# Altium PCB PCB Project Dual BLDC Motor.PcbDoc
Units mm, origin at the board's own origin, x right, y up, seen from the top; angles counter-clockwise.
Board outline 35 x 35 mm, 4 copper layers (Top Layer 1, GND, PWR, Bottom Layer 1), stack 0.603 mm thick; 55 components, 57 nets, 268 pads, 88 vias.
Unrouted connection lines stored in the file: 140.
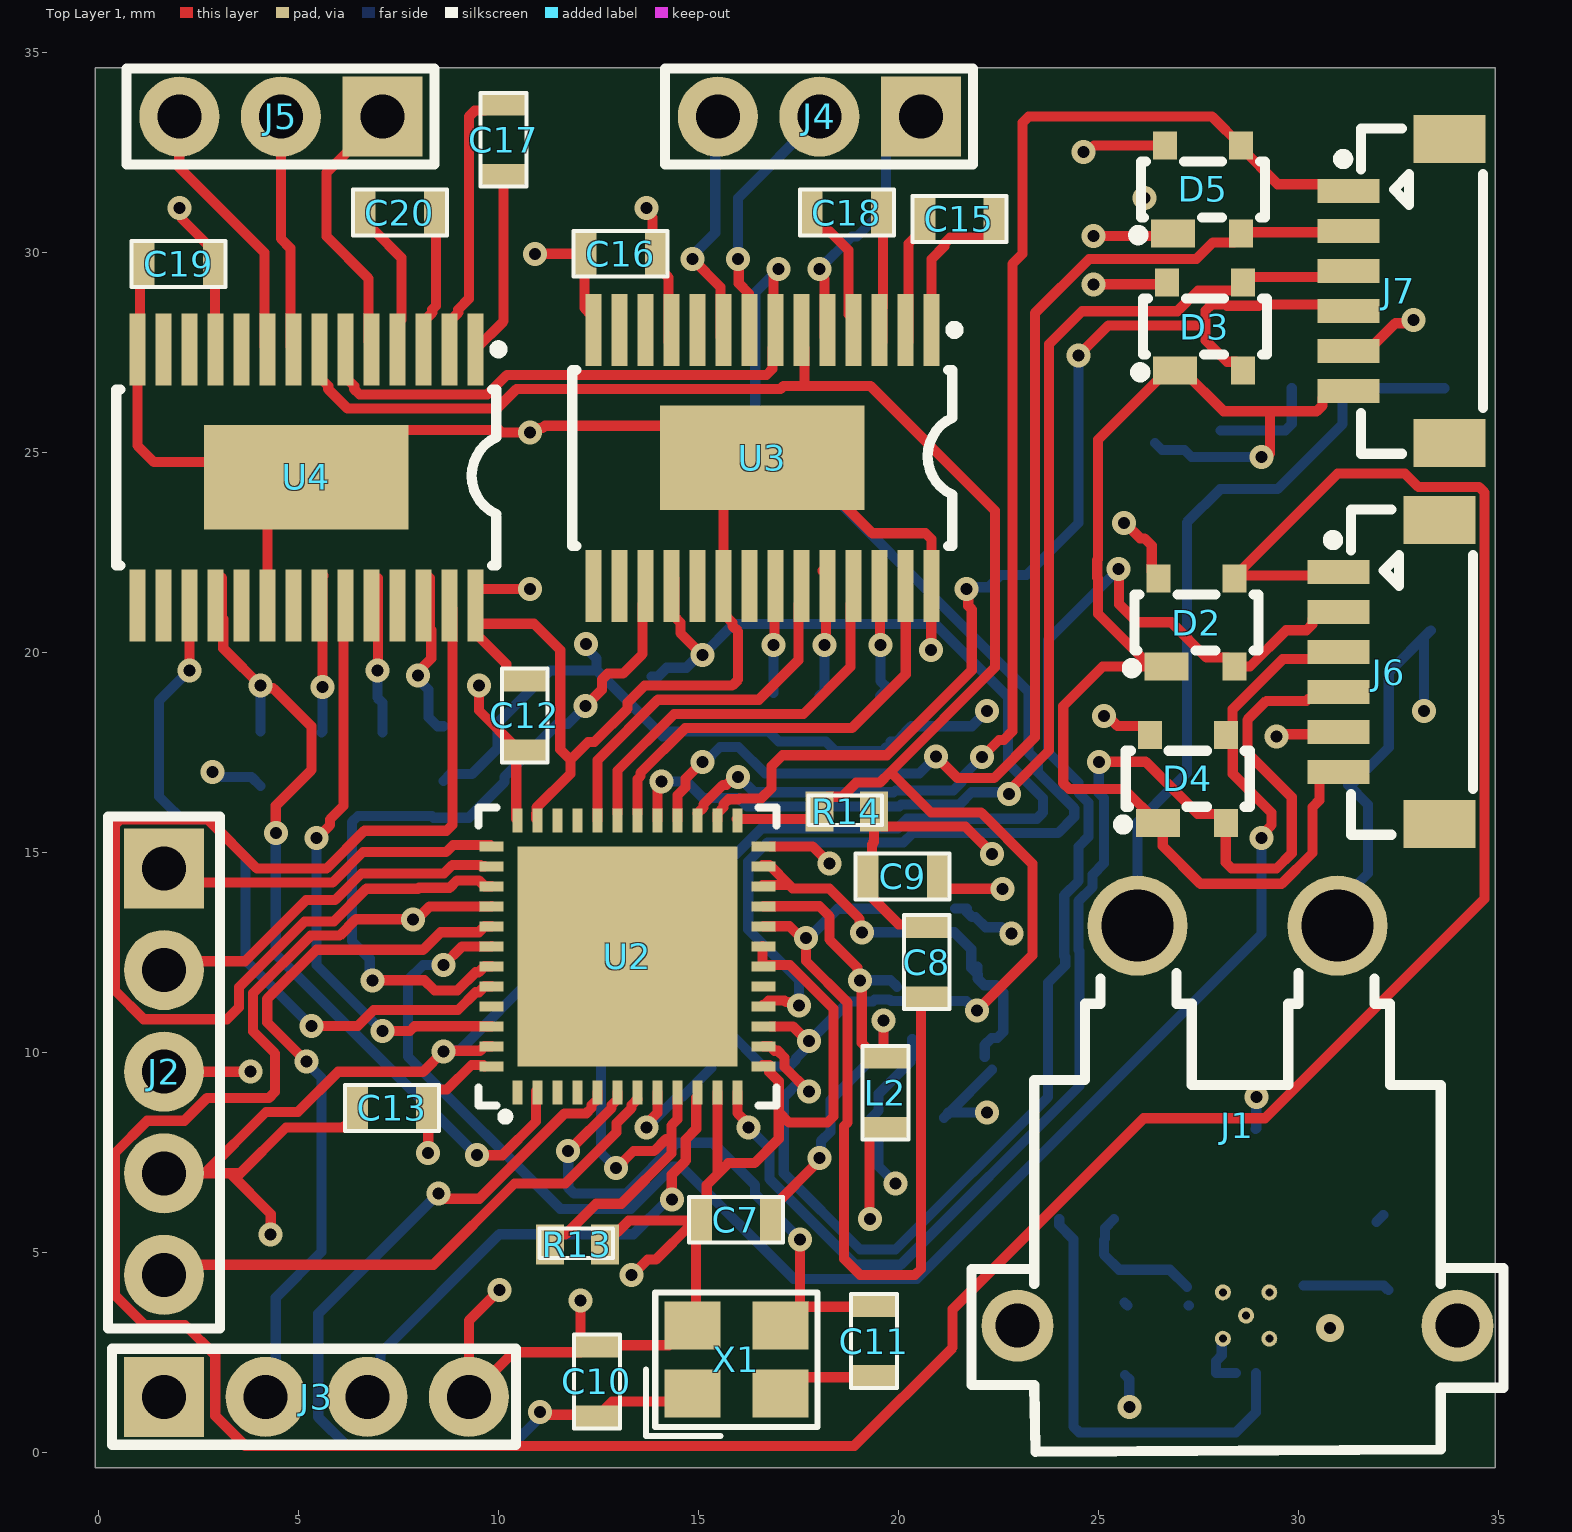
[diagram p0: Top Layer 1 view]
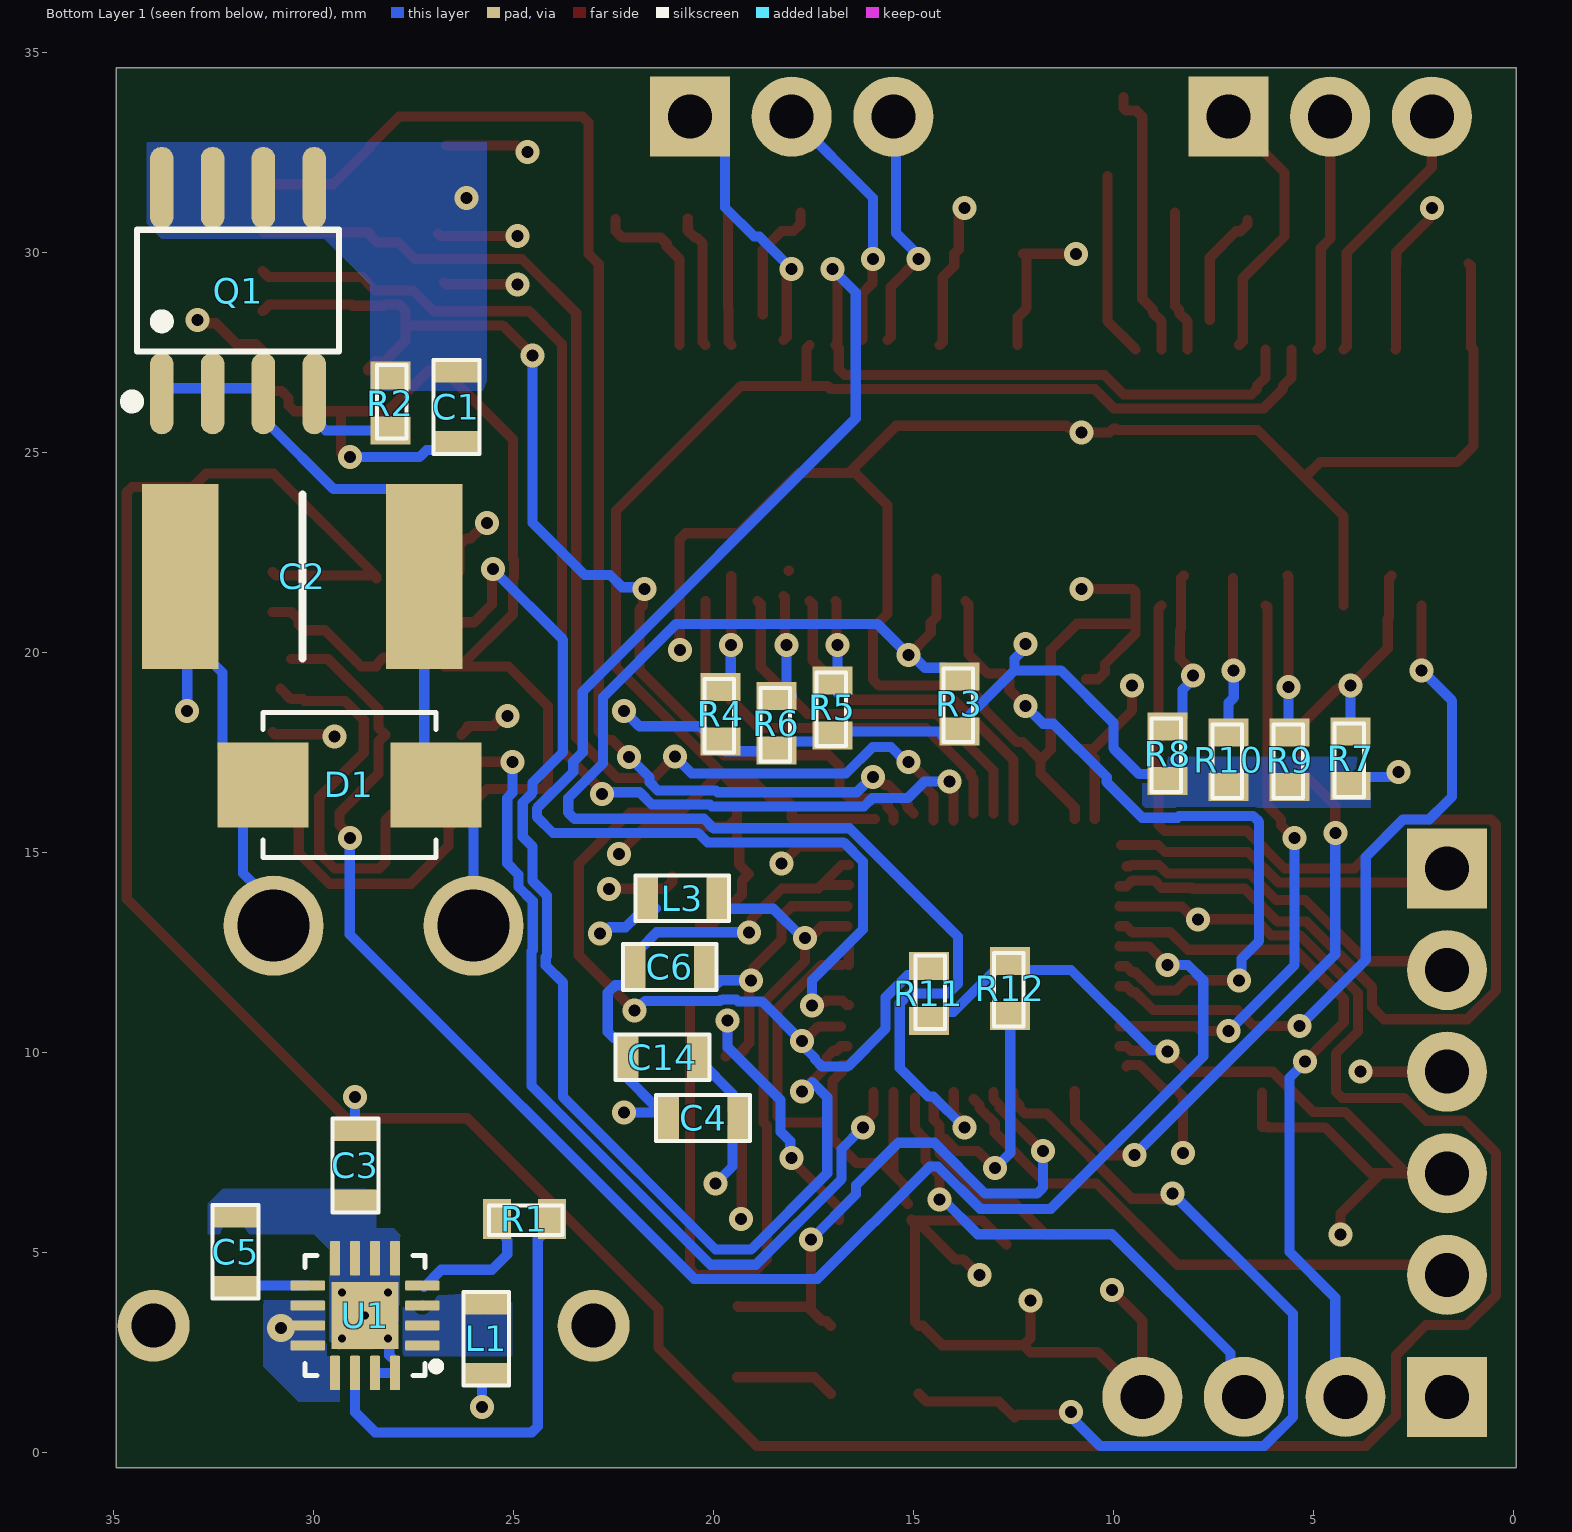
[diagram p1: Bottom Layer 1 view, seen from below]
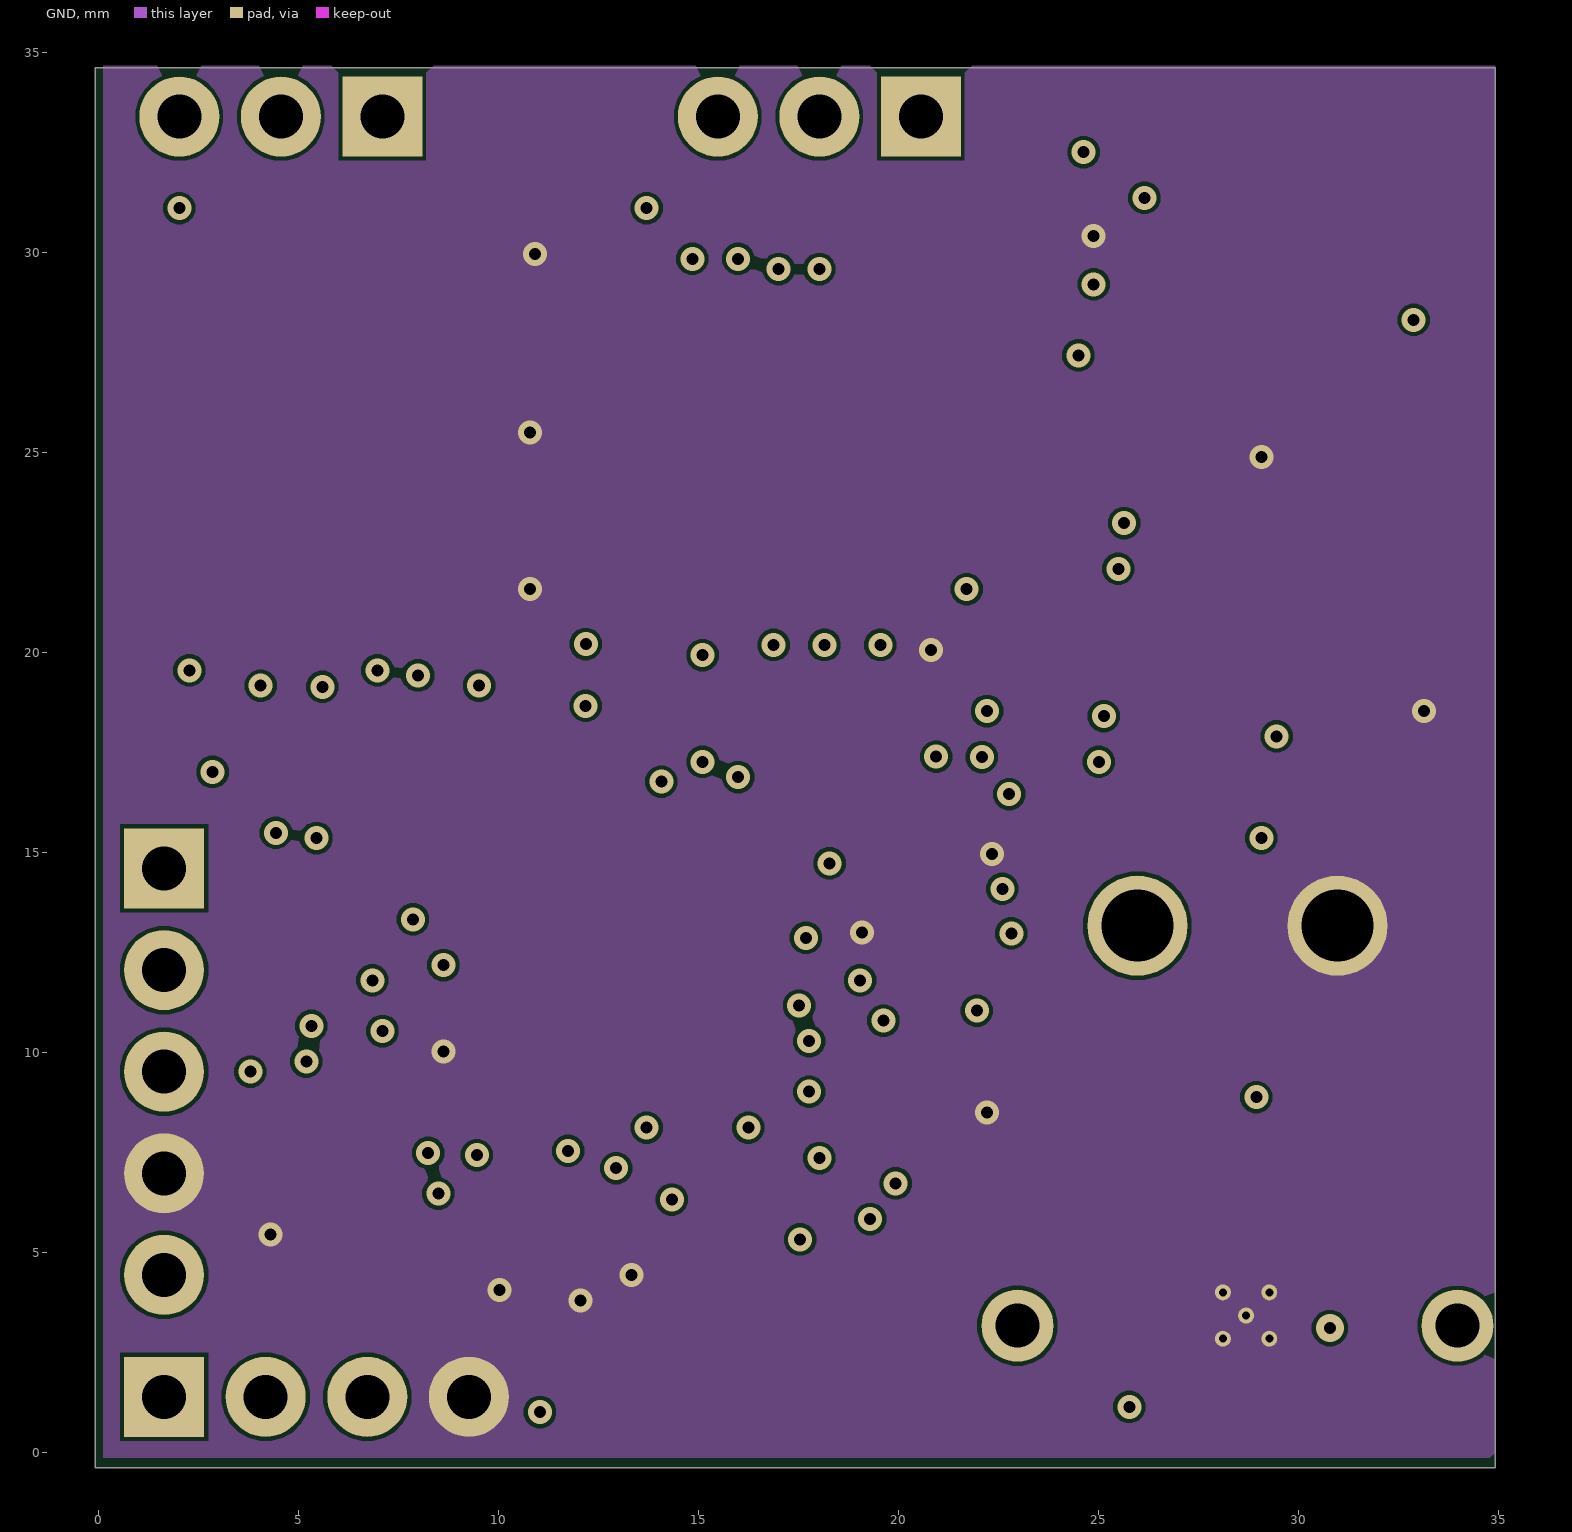
[diagram p2: GND]
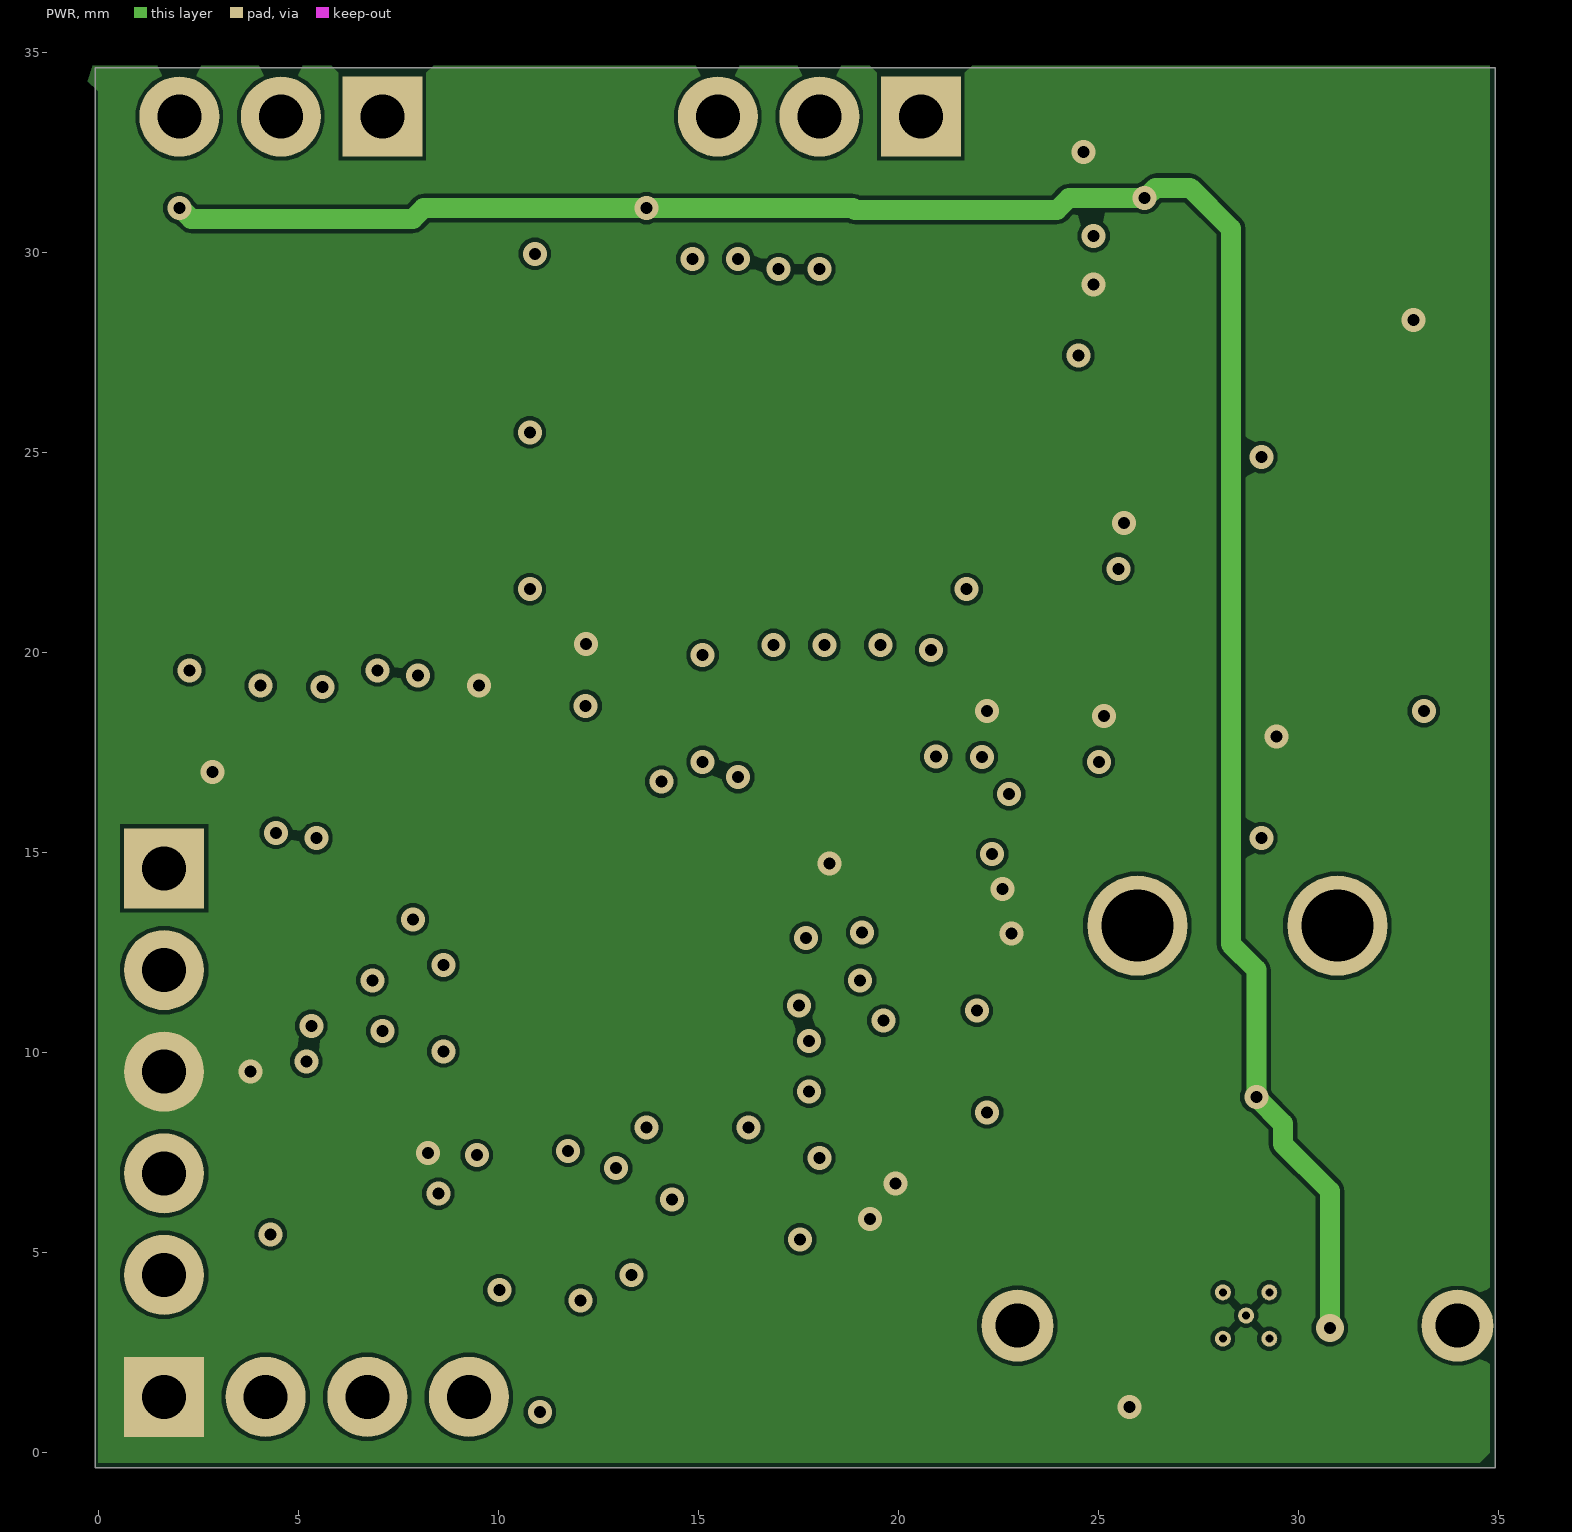
[diagram p3: PWR]

## Layer stack, top to bottom
Top Solder: solder mask 0.0102, Solder Resist, Dk 3.5
Top Layer 1: signal copper 0.035
Dielectric 2: prepreg 0.0711, PP-006, Dk 4.1
GND: signal copper 0.0356
Dielectric 1: dielectric 0.32, FR-4, Dk 4.8
PWR: signal copper 0.0356
Dielectric 3: prepreg 0.0711, PP-006, Dk 4.1
Bottom Layer 1: signal copper 0.035
Bottom Solder: solder mask 0.0102, Solder Resist, Dk 3.5

## Board outline
-0.075,-0.381 -0.075,34.619 34.925,34.619 34.925,-0.381

## Design rules (kind name [scope] priority, off if disabled: settings)
Clearance [All] p1: gap=0.1 ignorepadtopadclearanceinfootprint=FALSE
HoleSize [All] p1: absolutevalues=TRUE maxlimit=3 minlimit=0.025 maxpercent=80.000 minpercent=20.000
HoleToHoleClearance [All] p1: gap=0.01 allowstackedmicrovias=TRUE
MinimumSolderMaskSliver [All] p1: minsoldermaskwidth=0.01
PolygonConnect [All] p1: connectstyle=Direct reliefconductorwidth=0.254 reliefentries=4 polygonreliefangle="90 Angle" airgapwidth=0.254
RoutingVias [All] p1: holewidth=2.5 width=1.5 viastyle="Through Hole" minholewidth=0.3 minwidth=0.6 maxholewidth=3 maxwidth=3
SilkToSilkClearance [All] p1: silktosilkclearance=0.01
SilkToSolderMaskClearance [IsPad] p1: minsilkscreentomaskgap=0 clearancetoexposedcopper=TRUE
SolderMaskExpansion [All] p1: expansion=0.102 istentingtop=FALSE
SupplyNets "Schematic Supply Nets_4" [InNet('GND')] p1: voltage=0.000
SupplyNets "Schematic Supply Nets_2" [InNet('+12V')] p2: voltage=0.000
SupplyNets "Schematic Supply Nets_5" [InNet('+3V3')] p3: voltage=0.000
Width [All] p1: maxlimit=0.5 minlimit=0.254 preferedwidth=0.254 toplayer_maxwidth=0.254 midlayer1_maxwidth=0.254 bottomlayer_maxwidth=0.254 minimp=50.000000 maximp=50.000000 favimp=50.000000
25 further rules are at their usual default settings.

## Classes and differential pairs
component class Sheet4: D2 D3 D4 D5 J6 J7
component class Sheet3: C15 C16 C17 C18 C19 C20 J4 J5 R3 R4 R5 R6 R7 R8 R9 R10 R11 R12 R13 R14 U3 U4
component class Sheet2: C6 C7 C8 C9 C10 C11 C12 C13 C14 J2 J3 J? L2 L3 U2 X1
component class Sheet1: C1 C2 C3 C4 C5 D1 J1 L1 Q1 R1 R2 U1

## Components (designator, comment, footprint, x,y, rotation, side; value= is the part's Value field where it differs from the comment)
C1 "capacitor symbol" CAPACITOR#1 26.308,25.311 r90 bottom value=100nF
C2 "d" "CAPACITOR T59EE477M016C0025" 30.734,21.463 r180 bottom
C3 "capacitor symbol" CAPACITOR#1 28.829,6.35 r90 bottom value=10uF
C4 "capacitor symbol" CAPACITOR#1 21.082,8.255 r180 bottom value=22uF
C5 "capacitor symbol" CAPACITOR#1 32.045,5.855 r270 bottom value=3.3nF
C6 "capacitor symbol" CAPACITOR#1 21.916,12.034 r180 bottom value=1uF
C7 "capacitor symbol" CAPACITOR#2 15.113,5.715 r0 top value=1uF
C8 "capacitor symbol" CAPACITOR#2 20.828,11.43 r90 top value=1uF
C9 "capacitor symbol" CAPACITOR#2 19.281,14.295 r0 top value=1uF
C10 "6.8pF" CAPACITOR#2 12.582,0.945 r90 top value=1uF
C11 "6.8pF" CAPACITOR#2 19.295,3.627 r270 top value=1uF
C12 "capacitor symbol" CAPACITOR#2 10.56,19.266 r270 top value=1uF
C13 "capacitor symbol" CAPACITOR#2 6.515,8.505 r0 top value=1uF
C14 "capacitor symbol" CAPACITOR#1 22.098,9.779 r180 bottom value=1uF
C15 "capacitor symbol" CAPACITOR#2 20.701,30.734 r0 top value=0.01uF
C16 "capacitor symbol" CAPACITOR#2 12.23,29.864 r0 top value=10uF
C17 "capacitor symbol" CAPACITOR#2 10.033,33.655 r270 top value=0.01uF
C18 "capacitor symbol" CAPACITOR#2 19.558,31.115 r180 top value=100nF
C19 "capacitor symbol" CAPACITOR#2 1.181,29.61 r0 top value=10uF
C20 "capacitor symbol" CAPACITOR#2 8.382,31.115 r180 top value=100nF
D1 "SMBJ15CA" DIOM4336X265N 29.21,16.637 r180 bottom
D2 "PRTR5V0U2X-N" PRTR5V0U2X-N 28.404,21.864 r270 top
D3 "PRTR5V0U2X-N" PRTR5V0U2X-N 28.612,29.261 r270 top
D4 "PRTR5V0U2X-N" PRTR5V0U2X-N 28.182,17.958 r270 top
D5 "PRTR5V0U2X-N" PRTR5V0U2X-N 28.563,32.69 r270 top
J1 "J" XT30PW-M 28.256,5.595 r0 top
J2 "5 pin header" "5 PIN HEADER" 1.651,14.705 r0 top
J3 "hg" "4 PIN HEADEER STM32" 1.651,1.397 r90 top
J4 "B3B-EH-A(LF)(SN" "3 PIN HEADER" 20.674,33.301 r270 top
J5 "B3B-EH-A(LF)(SN" "3 PIN HEADER" 7.212,33.301 r270 top
J6 "BM06B-SRSS-TB(LF)(SN)" BM06B-SRSS-TB(LF)(SN) 32.893,19.558 r90 top
J7 "BM06B-SRSS-TB(LF)(SN)" BM06B-SRSS-TB(LF)(SN) 33.147,29.083 r90 top
L1 "2.2uH" CAPACITOR#1 25.781,3.683 r270 bottom
L2 "inductor" CAPACITOR#2 19.793,8.166 r90 top
L3 "inductor" CAPACITOR#1 19.939,13.97 r0 bottom
Q1 "AO4407A" AO4407A 33.778,31.774 r180 bottom
R1 "Resistor 1206" RESISTOR#1 24,5.842 r0 bottom
R2 "Resistor 1206" RESISTOR#1 28.067,26.956 r270 bottom
R3 "Resistor 1206" RESISTOR#1 13.843,18.002 r90 bottom
R4 "Resistor 1206" RESISTOR#1 19.812,17.748 r90 bottom
R5 "Resistor 1206" RESISTOR#1 17.018,17.904 r90 bottom
R6 "Resistor 1206" RESISTOR#1 18.415,17.523 r90 bottom
R7 "Resistor 1206" RESISTOR#1 4.064,16.634 r90 bottom
R8 "Resistor 1206" RESISTOR#1 8.636,16.761 r90 bottom
R9 "Resistor 1206" RESISTOR#1 5.588,16.605 r90 bottom
R10 "Resistor 1206" RESISTOR#1 7.112,16.605 r90 bottom
R11 "Resistor 1206" RESISTOR#1 14.605,12.195 r270 bottom
R12 "Resistor 1206" RESISTOR#1 12.573,10.89 r90 bottom
R13 "Resistor 1206" RESISTOR#2 11.271,5.207 r0 top
R14 "Resistor 1206" RESISTOR#2 18.002,16.025 r0 top
U1 "D" IC-TPS62132RGTR 28.772,3.49 r0 bottom
U2 "U" STM32G474CBT3 11.223,12.718 r0 top
U3 "U" DRV8313PWP 16.637,24.765 r270 top
U4 "U" DRV8313PWP 5.237,24.278 r270 top
X1 "24MHz" XL2EL89COI-111YLC-24M 14.928,3.167 r0 top

## Footprints (in the part's own frame and the unit in brackets; to place one, negate y for a bottom-side part, rotate by r counter-clockwise, add the part's x,y. Pads: shape width x height; smd on the part's side, far side on the other; paste and mask are expansions set on the pad)
"3 PIN HEADER" [mm]
  rect 2x2 hole 1.1: 1(-0.1,-0.1)
  round 2 hole 1.1: 2(-0.1,-2.64) 3(-0.1,-5.18)
  silkscreen extent -1.3,-6.5 1.1,1.2
"4 PIN HEADEER STM32" [mm]
  rect 2x2 hole 1.1: 1(0,0)
  round 2 hole 1.1: 2(0,-2.54) 3(0,-5.08) 4(0,-7.62)
  silkscreen extent -1.2,-8.8 1.2,1.3
"5 PIN HEADER" [mm]
  rect 2x2 hole 1.1: 1(0,-0.1)
  round 2 hole 1.1: 2(0,-2.64) 3(0,-5.18) 4(0,-7.72) 5(0,-10.26)
  silkscreen extent -1.4,-11.6 1.4,1.2
AO4407A [mm]
  oval 0.588x2.045 smd: 1(-0.004,-5.29) 2(1.266,-5.29) 3(2.536,-5.29) 4(3.806,-5.29) 5(3.806,-0.151) 6(2.536,-0.151) 7(1.266,-0.151) 8(-0.004,-0.151)
  silkscreen extent -0.9,-5.64 4.43,-1.2
BM06B-SRSS-TB(LF)(SN) [mm]
  rect 0.6x1.55 smd: 1(2.455,1.885) 2(1.455,1.885) 3(0.455,1.885) 4(-0.545,1.885) 5(-1.545,1.885) 6(-2.544,1.885)
  rect 1.2x1.8 smd: 7(-3.845,-0.64) 8(3.756,-0.64)
  silkscreen extent -4.11,-1.48 4.02,2.15
CAPACITOR#1 [mm]
  rect 0.6x1.2 smd paste-2539.97 mask+0.102: 1(-0.069,0.117) 2(1.74,0.108)
  silkscreen extent -0.34,-0.46 2.01,0.68
CAPACITOR#2 [mm]
  rect 0.6x1.2 smd paste-2539.97 mask-2539.97: 1(-0.069,0.117) 2(1.74,0.108)
  silkscreen extent -0.34,-0.46 2.01,0.68
"CAPACITOR T59EE477M016C0025" [mm]
  rect 1.92x4.62 smd: 1(-2.587,0.444) 2(3.513,0.444)
  silkscreen extent 0.46,-1.61 0.46,2.49
DIOM4336X265N [mm]
  rect 2.28x2.12 smd paste+0 mask+0.102: 1(-2.045,0.059) 2(2.285,0.059)
  silkscreen extent -2.04,-1.75 2.28,1.87
DRV8313PWP [mil]
  rect 71x16 smd paste+0 mask+2: 1(-130.16,165.32) 2(-130.16,139.73) 3(-130.16,114.14) 4(-130.16,88.55) 5(-130.16,62.96) 6(-130.16,37.37) 7(-130.16,11.78) 8(-130.16,-13.82) 9(-130.16,-39.41) 10(-130.16,-65) 11(-130.16,-90.59) 12(-130.16,-116.18) 13(-130.16,-141.77) 14(-130.16,-167.36) 15(121.81,-167.22) 16(121.81,-141.63) 17(121.81,-116.04) 18(121.81,-90.45) 19(121.81,-64.86) 20(121.81,-39.27) 21(121.81,-13.68) 22(121.81,11.78) 23(121.81,37.37) 24(121.81,62.96) 25(121.81,88.55) 26(121.81,114.14) 27(121.81,139.73) 28(121.81,165.32)
  rect 103.15x201.57 smd paste+0 mask+2: 29(-4.18,-1.19)
  silkscreen extent -134,-188 82,192
IC-TPS62132RGTR [mm]
  rrect25% 0.86x0.26 smd paste+0 mask+0.102: 1(-1.505,0.811) 2(-1.505,0.311) 3(-1.505,-0.189) 4(-1.505,-0.689) 9(1.365,-0.689) 10(1.365,-0.189) 11(1.365,0.311) 12(1.365,0.811)
  rrect25% 0.26x0.86 smd paste+0 mask+0.102: 5(-0.82,-1.374) 6(-0.32,-1.374) 7(0.18,-1.374) 8(0.68,-1.374) 13(0.68,1.496) 14(0.18,1.496) 15(-0.32,1.496) 16(-0.82,1.496)
  round 0.4 hole 0.2 mask+0: 17(-0.65,-0.519) 17(-0.65,0.641) 17(0.51,-0.519) 17(0.51,0.641)
  rect 1.68x1.68 smd paste-0.31 mask+0.102: 17(-0.07,0.061)
  round 0.4 hole 0.2 paste-0.31 mask+0.102: 17(-0.07,0.061)
  silkscreen extent -1.95,-1.44 1.43,1.56
PRTR5V0U2X-N [mm]
  rect 0.7x1.1 smd paste+0 mask+0.051: 1(2.21,-1.688)
  rect 0.7x0.6 smd paste+0 mask+0.051: 2(2.21,0.012) 3(0.01,0.012) 4(0.01,-1.888)
  silkscreen extent 0.41,-2.68 2.38,0.61
RESISTOR#1 [mm]
  rect 0.7x1 smd paste-2539.97 mask+0.102: 1(1.4,0) 2(0.032,0)
  silkscreen extent -0.24,-0.34 1.6,0.4
RESISTOR#2 [mm]
  rect 0.7x1 smd paste-2539.97 mask-2539.97: 1(1.4,0) 2(0.032,0)
  silkscreen extent -0.24,-0.34 1.6,0.4
STM32G474CBT3 [mm]
  rect 0.25x0.6 smd paste-100 mask+0.05: 1(-0.736,-3.708) 2(-0.236,-3.708) 3(0.264,-3.708) 4(0.764,-3.708) 5(1.264,-3.708) 6(1.764,-3.708) 7(2.264,-3.708) 8(2.764,-3.708) 9(3.264,-3.708) 10(3.764,-3.708) 11(4.264,-3.708) 12(4.764,-3.708) 25(4.764,3.092) 26(4.264,3.092) 27(3.764,3.092) 28(3.264,3.092) 29(2.764,3.092) 30(2.264,3.092) 31(1.764,3.092) 32(1.264,3.092) 33(0.764,3.092) 34(0.264,3.092) 35(-0.236,3.092) 36(-0.736,3.092)
  rect 0.6x0.25 smd paste-100 mask+0.05: 13(5.414,-3.058) 14(5.414,-2.558) 15(5.414,-2.058) 16(5.414,-1.558) 17(5.414,-1.058) 18(5.414,-0.558) 19(5.414,-0.058) 20(5.414,0.442) 21(5.414,0.942) 22(5.414,1.442) 23(5.414,1.942) 24(5.414,2.442) 37(-1.386,2.442) 38(-1.386,1.942) 39(-1.386,1.442) 40(-1.386,0.942) 41(-1.386,0.442) 42(-1.386,-0.058) 43(-1.386,-0.558) 44(-1.386,-1.058) 45(-1.386,-1.558) 46(-1.386,-2.058) 47(-1.386,-2.558) 48(-1.386,-3.058)
  rect 5.5x5.5 smd paste-100 mask+0.05: 49(2.014,-0.308)
  silkscreen extent -1.71,-4.42 5.74,3.42
XL2EL89COI-111YLC-24M [mm]
  rect 1.4x1.2 smd: 1(-0.069,-1.692) 2(2.131,-1.692) 3(2.131,0.008) 4(-0.069,0.008)
  silkscreen extent -1.23,-2.75 3.06,0.84
XT30PW-M [mm]
  round 2.5 hole 1.8 paste-2539.97 mask+0.051: 1(-2.269,7.58) 2(2.731,7.58)
  round 1.8 hole 1.1 paste-2539.97 mask+0.051: 3(5.731,-2.42) 4(-5.269,-2.42)
  silkscreen extent -6.42,-5.57 6.88,6.39

## Part data
C2: library part "Capacitor T59EE477M016C0025"
C10 C11: library part "capacitor symbol"
D1: "600W, 17.6V, 5%, Bidirectional, TVS", Package="SMB Taiwan Semiconductor", Check_prices=https://www.snapeda.com/parts/SMBJ15CA/taiwan/view-part/?ref=eda, MF="Taiwan Semiconductor Corporation", MP=SMBJ15CA, SnapEDA_Link=https://www.snapeda.com/parts/SMBJ15CA/taiwan/view-part/?ref=snap
D2 D3 D4 D5: JLCPCB Part Class="Extended Part", Manufacturer=BORN(伯恩半导体), Contributor=LCSC, Manufacturer Part=PRTR5V0U2X-N, spicePre=D, spiceSymbolName=PRTR5V0U2X-N, Supplier=LCSC, Supplier Part=C316030
J1: library part XT30PW-M
J3: library part "4 Pin header"
J4 J5: library part "3 pin header"
L1: library part inductor
Q1: library part AO4407A_C16072, Drain Source On Resistance (RDS(on)@Vgs,Id)=11mΩ@20V,12A, Gate Threshold Voltage (Vgs(th)@Id)=1.7V@250uA, Input Capacitance (Ciss@Vds)=2.6nF@15V, JLCPCB Part Class="Extended Part", LCSC Part Name="1个P沟道 耐压:30V 电流:12A", Manufacturer=AOS, Operating Temperature=-55℃~+150℃, Reverse Transfer Capacitance (Crss@Vds)=295pF@15V, Add into BOM=yes, Convert to PCB=yes, Datasheet=https://atta.szlcsc.com/upload/public/pdf/source/20130807/1457706632699.pdf, Device=AO4407A_C16072, Manufacturer Part=AO4407A, Supplier=LCSC, Supplier Footprint=SOIC-8, Supplier Part=C16072, Symbol=AO4407A, Total Gate Charge (Qg@Vgs)=39nC@10V, Type="1 Piece P-Channel"
R1 R2 R3 R4 R5 R6 R7 R8 R9 R10 R11 R12 R13 R14: Manuf=YAGEO, Mfr. Part #=RC1206FR-0710KL, Package=1206, Seller=LCSC, Seller Part #=C132649
U1: library part TPS62132RGTR
U2: library part STM32G474CBT3
U3 U4: library part DRV8313PWP
X1: library part XL2EL89COI-111YLC-24M, Frequency Stability=±20ppm, JLCPCB Part Class="Extended Part", LCSC Part Name="YSX321SL 24MHZ 4P 3225 12PF ±10PPM -40~85℃ (±20PPM)", Load Capacitance=12pF, Manufacturer=YXC(扬兴晶振), Normal temperature Frequency Tolerance=±10ppm, Operating Temperature=-40℃~+85℃, Add into BOM=yes, Convert to PCB=yes, Datasheet=https://item.szlcsc.com/datasheet/XL2EL89COI-111YLC-24M/6336541.html, Device=XL2EL89COI-111YLC-24M, Manufacturer Part=XL2EL89COI-111YLC-24M, Supplier=LCSC, Supplier Footprint=SMD3225-4P, Supplier Part=C5444545, Symbol=XL2EL89COI-111YLC-24M, Type="Crystal Oscillator"

## Via types
v1: diameter 0.6, hole 0.3, Top Layer 1 to Bottom Layer 1, 87 vias
v2: diameter 0.7, hole 0.3, Top Layer 1 to Bottom Layer 1, 1 vias

## Nets (pads, with @x,y where several pads share a name; then routed paths per layer and width w, separated by ;. In a path a pad name is that pad's centre, name@x,y a point inside that pad or via, vN(x,y) a via of type N, cw(c..) or ccw(c..) an arc to the next point about the centre after c; other vN are vias at no path point)
+3V3: C4.2 C9.2 C12.2 C13.2 C14.2 D2.4 D3.4 D4.4 D5.4 J2.3 J3.1 J6.5 J7.5 L1.2 L2.1 L3.2 R3.2 R4.2 R5.2 R6.2 R7.2 R8.2 R9.2 R10.2 U2.24 U2.36 U2.48 | length 51.1
  Top Layer 1 w0.254: J2.3 v1(3.81,9.525) ; v1(8.255,7.493) C13.2 8.255,8.905 8.428,9.078 8.72,9.078 9.336,9.694 9.632,9.694 U2.48@9.664,9.662 ; v1(9.525,19.177) 9.525,18.555 10.485,17.595 C12.2@10.785,17.595 ; U2.36@10.458,15.846 10.458,17.353 10.631,17.526 C12.2 ; U2.24@16.81,15.158 17.862,15.158 v1(18.288,14.732) ; v1(19.304,5.842) 19.285,5.861 19.285,8.023 L2.1@19.304,8.042 ; C9.2 21.021,14.27 21.194,14.097 v1(22.606,14.097) ; v1(24.638,32.512) 24.732,32.512 24.9,32.68 D5.4 ; v1(24.892,29.21) 26.683,29.21 D3.4 ; v1(25.146,18.415) 25.24,18.415 25.484,18.171 26.121,18.171 26.147,18.145 26.147,18.095 D4.4 ; v1(25.654,23.241) 25.673,23.241 26.055,22.859 26.163,22.859 26.343,22.679 26.343,22.027 D2.4 ; v1(29.464,17.907) 29.517,17.96 30.955,17.96 J6.5 ; J7.5 31.435,27.711 31.91,27.711 32.435,28.236 32.808,28.236 v1(32.893,28.321)
  Bottom Layer 1 w0.254: v1(2.863,17.018) 2.984,17.018 3.113,16.889 3.841,16.889 R7.2 ; R8.2 8.808,16.965 9.345,16.965 9.993,17.613 9.993,18.248 11.303,19.558 12.466,19.558 ; v1(12.194,20.216) 12.194,20.122 12.466,19.85 12.466,19.558 ; R3.2@14.268,17.906 14.118,17.906 R3.2@13.99,18.034 ; R6.2@18.415,17.536 R4.2@19.685,17.536 ; R6.2 18.192,17.778 17.018,17.778 16.762,18.034 R3.2@13.99,18.034 ; R4.2@19.685,17.634 R4.2@19.762,17.557 ; R4.2 19.962,17.78 20.185,18.003 20.185,18.012 20.334,18.161 21.844,18.161 v1(22.225,18.542) ; v1(19.939,6.731) 19.515,7.155 19.515,8.171 19.323,8.363 19.515,8.555 19.515,8.974 C14.2@20.312,9.771 ; C14.2 C14.2@20.358,10.338 ; L3.2@21.425,13.608 21.717,13.608 21.717,13.524 21.852,13.389 21.936,13.389 22.19,13.135 22.585,13.135 22.739,12.982 v1(22.832,12.982) ; L1.2 25.781,1.835 v1(25.781,1.143) ; 12.466,19.558 R3.2@13.99,18.034
+12V: C1.2 C3.2 C16.2 C19.2 Q1.5 Q1.6 Q1.7 Q1.8 R2.2 U1.10 U1.11 U1.12 U1.13 U3.11 U4.11 | length 64
  Top Layer 1 w0.254: v1(2.032,31.115) 2.098,31.049 2.098,30.841 2.921,30.018 C19.2 2.929,29.71 2.929,27.592 U4.11 ; v1(13.716,31.115) 13.716,31.021 13.86,30.877 13.86,30.082 C16.2 13.97,29.672 14.26,29.382 14.26,27.766 U3.11@14.336,27.69
  PWR w0.5: v1@2.078,31.096 2.328,30.846 7.874,30.846 8.143,31.115 v1(13.716,31.115) 18.873,31.115 18.922,31.066 23.973,31.066 24.275,31.369 26.189,31.369 26.443,31.623 27.305,31.623 28.321,30.607 28.321,12.714 28.956,12.079 v1(28.956,8.89) 29.621,8.225 29.621,7.717 30.797,6.54 v2(30.797,3.111)
  Bottom Layer 1 w0.254: C3.2 28.956,8.109 v1(28.956,8.89)
  other v1: 26.162,31.369
CS1: D4.2 J6.4 U2.12 | length 34.3
  Top Layer 1 w0.254: U2.12 15.989,9.008 15.989,8.489 16.256,8.222 v1(16.256,8.128) ; v1(25.019,17.272) 26.191,17.272 27.492,15.971 28.021,15.971 28.194,15.798 D4.2 ; D4.2@28.194,15.698 28.194,14.754 28.343,14.605 29.464,14.605 29.845,14.986 29.845,16.389 29.159,17.075 28.735,17.5 28.735,18.321 29.21,18.796 30.211,18.796 30.255,18.84 30.556,18.84 J6.4@30.814,19.098
  Bottom Layer 1 w0.254: v1(16.256,8.128) 16.791,7.593 16.791,6.838 18.93,4.699 20.066,4.699 24.536,9.169 24.536,12.537 24.51,12.563 24.51,13.787 24.865,14.142 24.865,14.451 25.146,14.732 25.146,16.368 25.019,16.495 v1(25.019,17.272)
CS2: D3.2 J7.4 U2.26 | length 27.4
  Top Layer 1 w0.254: U2.26 15.487,15.981 15.635,16.129 15.635,16.204 15.768,16.337 16.014,16.337 16.035,16.358 16.585,16.358 16.839,16.612 16.839,17.162 17.113,17.437 19.723,17.437 21.844,19.558 21.844,21.082 21.754,21.172 21.754,21.553 v1(21.717,21.59) ; v1(24.511,27.432) 25.262,28.183 27.686,28.183 ; D3.2 28.624,27.101 28.451,27.274 28.225,27.274 27.686,27.813 27.686,28.183 ; J7.4 31.098,28.702 29.046,28.702 29.018,28.674 28.23,28.674 28.202,28.702 27.835,28.702 27.686,28.553 27.686,28.183
  Bottom Layer 1 w0.254: v1(21.717,21.59) 21.763,21.636 22.271,21.636 22.576,21.941 23.211,21.941 24.511,23.241 v1(24.511,27.432)
"DRV1 NFAULT": R3.1 U2.8 U3.18 | length 34.4
  Top Layer 1 w0.254: v1(13.716,8.128) 13.716,8.222 13.985,8.491 13.985,9.008 U2.8 ; U3.18@14.416,21.849 14.416,20.896 14.559,20.753 14.559,20.492 v1(15.113,19.939)
  Bottom Layer 1 w0.254: v1(13.716,8.128) 14.494,8.906 14.621,8.906 15.332,9.617 15.332,11.239 15.092,11.479 14.118,11.479 13.878,11.719 13.878,12.902 16.589,15.613 19.992,15.613 20.227,15.848 23.468,15.848 23.622,16.002 23.622,16.366 22.752,17.236 22.752,18.887 20.919,20.72 15.894,20.72 v1(15.113,19.939) 15.019,19.939 14.705,19.625 14.216,19.625 13.993,19.402 R3.1
"DRV2 NFAULT": R7.1 U2.2 U4.18 | length 21.8
  Top Layer 1 w0.254: U4.18@3.037,21.925 3.102,21.859 3.102,20.866 3.132,20.835 3.132,20.109 4.149,19.092 4.168,19.111 4.367,19.111 4.401,19.076 4.419,19.076 5.334,18.161 5.334,17.065 4.445,16.176 v1(4.445,15.494) ; v1(9.47,7.438) 10.105,7.438 10.948,8.281 10.948,8.788 10.956,8.796 10.956,8.873 10.958,8.875 U2.2@10.958,9.046
  Bottom Layer 1 w0.254: R7.1 v1(4.064,19.177) ; v1(4.445,15.494) 4.445,12.463 v1(9.47,7.438)
DRV8313_1: U2.43 U3.17 | length 18.1
  Top Layer 1 w0.254: v1(6.858,11.811) 8.159,11.811 8.413,11.557 8.987,11.557 9.442,12.012 9.513,12.012 9.515,12.014 9.52,12.014 9.666,12.16 U2.43 ; v1(12.192,18.669) 12.596,19.073 12.596,19.327 12.745,19.476 13.126,19.476 13.613,19.963 13.613,21.214 U3.17@13.69,21.29
  Bottom Layer 1 w0.254: v1(6.858,11.811) 6.792,11.877 6.792,12.352 6.35,12.794 6.35,15.77 6.499,15.918 8.346,15.918 8.39,15.875 9.271,15.875 10.16,16.764 10.16,16.891 11.494,18.225 11.748,18.225 v1(12.192,18.669)
DRV8313_2: U2.44 U4.17 | length 17.7
  Top Layer 1 w0.254: v1(2.286,19.558) 2.288,19.56 2.288,21.182 U4.17 ; v1(5.334,10.668) 6.494,10.668 6.894,11.068 8.999,11.068 9.443,11.512 9.518,11.512 9.666,11.66 U2.44
  Bottom Layer 1 w0.254: v1(2.286,19.558) 1.524,18.796 1.524,16.405 1.673,16.256 2.097,15.832 2.745,15.832 3.683,14.894 3.683,12.319 v1(5.334,10.668)
GND: C1.1 C2.1 C3.1 C4.1 C5.1 C6.1 C7.1 C8.2 C9.1 C10.2 C11.2 C12.1 C13.1 C14.1 C16.1 C19.1 D1.1 D2.1 D3.1 D4.1 D5.1 J1.2 J2.4 J3.4 J6.6 J7.6 R11.1 R12.1 R13.1 R14.1 U1.5 U1.6 U1.7 U1.8 U1.15 U1.16 U1.17 U2.11 U2.13 U2.18 U2.19 U2.22 U2.23 U2.35 U2.47 U3.14 U3.20 U3.28 U3.29 U4.14 U4.20 U4.28 U4.29 X1.2 X1.4 | length 184.9
  Top Layer 1 w0.254: C19.1 1.049,29.664 1.049,27.647 U4.14 0.986,25.176 1.399,24.763 4.828,24.763 U4.29 ; J2.4 2.667,6.985 ; U4.20 4.24,23.417 U4.29 ; v1(4.318,5.461) 4.318,5.969 3.302,6.985 ; C13.1@6.281,9.007 6.281,8.157 6.273,8.149 6.145,8.149 6.124,8.128 4.699,8.128 3.556,6.985 3.302,6.985 ; U4.28@9.512,20.725 10.898,20.725 11.557,20.066 11.557,17.579 11.811,17.325 ; U2.47 9.666,10.16 9.554,10.048 8.651,10.048 8.128,9.525 6.005,9.525 4.997,8.517 4.199,8.517 2.667,6.985 ; v1(10.033,4.064) 9.271,3.302 J3.4 10.386,2.512 12.065,2.512 C10.2@12.238,2.685 ; C12.1 10.377,19.335 10.204,19.508 10.204,19.717 9.436,20.485 9.436,21.514 9.512,21.59 v1(10.795,21.59) ; v1(10.795,25.508) 10.086,25.508 9.987,25.607 9.931,25.607 9.891,25.567 6.39,25.567 U4.29 ; v1@10.795,25.527 10.882,25.614 11.114,25.614 11.172,25.673 15.424,25.673 U3.29@16.607,24.49 ; v1(10.922,29.972) C16.1@12.25,29.972 ; U2.35@10.958,15.846 10.958,15.98 10.96,15.982 10.96,16.122 11.811,16.973 11.811,17.325 ; v1(12.065,3.81) 12.065,2.858 C10.2@12.238,2.685 ; C16.1 12.161,28.614 12.31,28.465 12.386,28.389 U3.14@12.386,27.69 ; R13.1 13.266,5.802 14.837,5.802 15.014,5.802 C7.1 15.044,5.808 14.952,5.717 14.952,3.268 X1.4 14.759,3.175 14.269,2.685 C10.2@12.238,2.685 ; v1(13.335,4.445) 13.357,4.445 13.738,4.826 13.946,4.826 C7.1@14.837,5.717 ; C7.1@15.135,6.223 15.217,6.305 15.217,6.693 15.487,6.963 ; U2.11 15.487,6.963 ; U2.13@16.608,9.696 16.779,9.696 16.781,9.694 16.781,9.523 17.018,9.286 17.018,8.509 ; U2.18@16.608,12.198 U2.19@16.608,12.66 ; U2.23@16.608,14.696 16.779,14.696 17.281,14.194 ; U2.22@16.61,14.194 17.281,14.194 ; U2.18@16.781,12.194 17.294,12.194 18.386,11.102 18.386,8.404 18.238,8.255 17.272,8.255 17.018,8.509 ; X1.2 17.471,1.887 C11.2 ; v1(19.105,13.009) 19.039,13.075 19.039,13.346 18.279,14.106 17.369,14.106 17.281,14.194 ; R14.1 R14.1@19.402,15.875 ; C8.2@20.32,13.208 20.02,13.208 19.281,13.947 19.281,14.295 19.108,14.468 19.346,14.706 19.346,15.209 19.402,15.265 R14.1@19.402,15.875 ; v1(20.828,20.066) 20.832,20.07 20.832,21.286 20.836,21.29 20.836,22.838 20.687,22.987 19.36,22.987 17.857,24.49 U3.29@16.607,24.49 ; v1(22.352,14.967) 22.352,14.986 21.686,15.652 19.625,15.652 R14.1@19.402,15.875 ; v1(24.892,30.416) 26.811,30.416 D5.1 ; D2.1 D2.1@26.32,19.654 ; v1@29.21,24.892 29.303,24.985 29.303,26.035 ; J6.6 30.706,17.014 30.533,16.841 30.533,16.309 30.36,16.136 30.36,14.993 29.591,14.224 27.559,14.224 26.617,15.166 26.617,15.625 D4.1 25.651,16.591 24.279,16.591 24.13,16.74 24.13,18.669 25.115,19.654 D2.1@26.32,19.654 ; J7.6 30.787,26.539 30.614,26.366 30.614,26.184 30.466,26.035 29.303,26.035 ; 2.667,6.985 3.302,6.985 ; 11.811,17.325 12.252,17.766 12.406,17.766 13.241,18.602 13.241,18.755 13.663,19.177 15.853,19.177 16.002,19.326 16.002,20.533 15.859,20.675 15.859,20.753 15.64,20.973 15.64,23.688 16.442,24.49 U3.29@16.607,24.49 ; 15.487,6.963 15.748,7.224 15.748,7.239 16.412,7.239 17.018,7.845 17.018,8.509 ; D2.1@26.32,19.654 25,20.974 25,21.86 24.98,21.88 24.98,22.316 25,22.336 25,25.327 26.724,27.051 27.124,27.051 28.14,26.035 29.303,26.035
  Bottom Layer 1 w0.254: v1(8.636,10.033) 8.673,10.07 9.054,10.07 11.051,12.067 12.35,12.067 R12.1 12.723,12.29 13.995,11.018 14.382,11.018 R11.1 ; v1(19.105,13.009) 21.408,13.009 21.829,12.588 21.829,12.12 C6.1@22.002,11.947 ; C4.1 21.269,8.49 C14.1@22.351,9.572 ; C4.1@21.25,8.509 v1(22.225,8.509) ; C6.1@21.985,11.851 C6.1 21.985,11.858 22.158,11.685 22.45,11.685 22.632,11.503 22.632,10.518 22.484,10.369 22.34,10.369 22.167,10.196 C14.1 ; C1.1 26.598,25.069 27.161,25.069 27.338,24.892 v1(29.083,24.892) ; U1.17@28.122,2.849 28.094,2.821 28.094,2.436 27.952,2.294 U1.16 U1.15 ; J1.2@31.035,13.208 31.035,13.765 31.75,14.48 31.75,16.201 D1.1 31.335,16.696 32.268,17.629 32.268,19.504 C2.1@33.321,20.557 ; C5.1@31.959,5.769 C5.1@32.131,5.941 ; v1(33.147,18.542) C2.1@33.147,20.383
M1U: U2.30 U3.27 | length 10.5
  Top Layer 1 w0.254: U2.30@13.487,15.983 13.487,16.843 13.558,16.914 13.558,16.994 14.679,18.115 18.846,18.115 20.193,19.462 20.193,21.283 U3.27@20.186,21.29
M1V: U2.31 U3.25 | length 9.6
  Top Layer 1 w0.254: U2.31@12.989,15.983 12.989,17.053 14.405,18.469 17.636,18.469 18.81,19.642 18.81,21.214 U3.25@18.886,21.29
M1W: U2.32 U3.23 | length 9.1
  Top Layer 1 w0.254: U2.32 12.487,17.313 13.997,18.823 16.52,18.823 17.51,19.813 17.51,21.214 U3.23@17.586,21.29
M2U: U2.39 U4.27 | length 30.6
  Top Layer 1 w0.254: U4.27 8.862,21.108 8.862,15.697 8.714,15.548 6.658,15.548 5.715,14.605 3.972,14.605 2.745,15.832 0.557,15.832 0.424,15.699 0.424,11.557 1.143,10.838 3.225,10.838 3.525,11.137 3.525,11.638 5.168,13.281 5.893,13.281 6.709,14.097 8.001,14.097 8.028,14.124 8.79,14.124 8.974,14.308 9.518,14.308 9.666,14.16 U2.39
M2W: U2.46 U4.23 | length 14.4
  Top Layer 1 w0.254: v1(5.461,15.367) 5.479,15.367 5.8,15.689 5.8,15.833 6.138,16.171 6.138,21.135 U4.23 ; v1(7.112,10.541) 7.799,10.541 7.92,10.662 9.835,10.662 U2.46
  Bottom Layer 1 w0.254: v1(5.461,15.367) 5.461,12.192 v1(7.112,10.541)
MISO1: D2.2 J6.2 U2.14 | length 35.7
  Top Layer 1 w0.254: U2.14 16.808,10.16 16.918,10.05 16.993,10.05 17.164,9.879 17.164,9.641 v1(17.78,9.025) ; v1(25.507,22.098) 25.527,22.078 25.527,21.209 25.975,20.761 26.83,20.761 27.714,19.877 28.243,19.877 28.416,19.704 D2.2 28.798,19.654 29.704,20.56 30.211,20.56 30.36,20.709 30.36,20.84 30.533,21.013 J6.2
  Bottom Layer 1 w0.254: 17.526,9.271 17.145,8.89 17.145,6.985 19.05,5.08 19.939,5.08 23.749,8.89 23.749,11.747 24.182,12.18 24.182,12.391 24.156,12.417 24.156,13.933 24.511,14.288 24.511,15.147 24.76,15.396 24.76,16.254 24.511,16.503 24.511,16.757 23.749,17.519 23.749,20.32 25.507,22.078 v1(25.507,22.098)
MISO2: D5.2 J7.2 U2.28 | length 30.6
  Top Layer 1 w0.254: U2.28 14.489,15.812 14.489,16.435 14.688,16.633 14.688,16.847 v1(15.113,17.272) ; v1(20.955,17.399) 21.49,16.864 22.399,16.864 23.422,17.887 23.422,28.485 24.779,29.843 27.459,29.843 27.873,30.257 28.402,30.257 28.575,30.43 D5.2 28.604,30.509 31.233,30.509 J7.2
  Bottom Layer 1 w0.254: v1(15.113,17.272) 15.181,17.272 15.552,17.643 16.012,17.643 16.677,16.978 20.534,16.978 v1(20.955,17.399)
MOSI1: D4.3 J6.3 U2.42 | length 41.4
  Top Layer 1 w0.254: v1(8.636,12.192) 9.102,12.658 9.835,12.658 U2.42 ; v1(29.083,15.367) 29.083,15.435 29.337,15.689 29.337,16.002 28.367,16.972 28.367,17.775 D4.3 28.364,18.118 28.364,18.585 29.619,19.84 J6.3@30.556,19.84
  Bottom Layer 1 w0.254: v1(8.636,12.192) 8.128,12.192 7.747,11.811 7.747,9.906 11.557,6.096 13.32,6.096 14.375,7.152 14.586,7.152 17.392,4.345 20.474,4.345 29.083,12.954 v1(29.083,15.367)
MOSI2: D3.3 J7.3 U2.29 | length 30
  Top Layer 1 w0.254: U2.29 13.989,15.812 13.989,16.586 14.085,16.682 v1(14.085,16.776) ; v1(22.78,16.463) 22.78,16.557 23.776,17.553 23.776,27.713 24.6,28.537 26.981,28.537 27.5,29.056 28.451,29.056 28.624,29.229 D3.3 28.768,29.395 31.118,29.395 J7.3
  Bottom Layer 1 w0.254: v1(14.085,16.776) 14.72,16.776 15.132,16.364 16.021,16.364 16.229,16.156 20.035,16.156 20.081,16.202 21.529,16.202 21.837,16.51 22.733,16.51 v1(22.78,16.463)
NetC2_2: C2.2 D1.2 J1.1 Q1.1 Q1.2 Q1.3 | length 18.8
  Bottom Layer 1 w0.254: J1.1@25.987,13.302 25.987,15.763 26.92,16.696 D1.2 27.221,16.992 C2.2 27.221,23.257 28.054,24.09 29.487,24.09 31.115,25.718 31.115,26.61 32.512,26.61 Q1.1@33.655,26.61
NetC5_2: C5.2 U1.9 | length 2.2
  Bottom Layer 1 w0.254: U1.9 30.14,4.176 32.146,4.176 C5.2@32.258,4.064
NetC6_2: C6.2 C7.2 L2.2 U2.21 | length 13.6
  Top Layer 1 w0.254: U2.21 18.036,13.66 18.288,13.408 18.288,12.827 18.984,12.131 18.984,11.877 19.094,11.767 19.094,10.243 19.212,10.125 19.212,10.079 19.258,10.033 L2.2@19.304,10.033 ; C7.2 16.853,6.123 18.034,7.304 v1(18.034,7.366) ; v1(19.637,10.801) 19.637,9.954 L2.2
  Bottom Layer 1 w0.254: v1(18.034,7.366) 18.071,7.403 18.071,7.784 18.312,8.025 18.312,8.811 19.637,10.136 v1(19.637,10.801) ; v1(19.05,11.811) 19.812,11.811 C6.2@19.978,11.645
NetC8_1: C8.1 L3.1 U2.20 | length 20.7
  Top Layer 1 w0.254: U2.20 17.286,13.16 17.575,12.872 v1(17.698,12.872) 17.698,12.29 18.74,11.248 18.74,8.257 18.65,8.167 18.65,4.845 19.05,4.445 20.425,4.445 20.574,4.594 C8.1@20.574,11.226
  Bottom Layer 1 w0.254: v1(17.698,12.872) 17.766,12.872 18.493,13.599 L3.1@19.616,13.599
NetC15_1: C15.1 U3.2 | length 3.4
  Top Layer 1 w0.254: U3.2@20.186,27.69 20.262,27.766 20.262,30.229 20.411,30.378 20.459,30.378 20.632,30.551 C15.1
NetC15_2: C15.2 U3.1 | length 4.4
  Top Layer 1 w0.254: U3.1@20.836,27.69 20.836,29.834 21.159,30.157 21.159,30.228 21.308,30.376 22.268,30.376 22.441,30.549 C15.2
NetC17_1: C17.1 U4.2 | length 6.9
  Top Layer 1 w0.254: U4.2 8.786,28.282 9.006,28.502 9.006,28.58 9.271,28.845 9.271,33.402 9.42,33.551 9.677,33.551 9.741,33.615 C17.1@9.741,33.894
NetC17_2: C17.2 U4.1 | length 4.6
  Top Layer 1 w0.254: U4.1 10.141,28.288 C17.2
NetC18_1: C18.1 U3.3 | length 3.3
  Top Layer 1 w0.254: U3.3@19.536,27.69 19.612,27.766 19.612,28.599 19.627,28.614 C18.1
NetC18_2: C18.2 U3.4 | length 3.1
  Top Layer 1 w0.254: C18.2 17.818,30.715 17.991,30.542 18.283,30.542 18.759,30.066 U3.4@18.759,28.452
NetC20_1: C20.1 U4.3 | length 3.5
  Top Layer 1 w0.254: U4.3 8.136,28.282 8.356,28.502 8.356,28.58 8.451,28.675 8.451,29.926 C20.1
NetC20_2: C20.2 U4.4 | length 2.9
  Top Layer 1 w0.254: C20.2@6.642,30.818 6.642,30.707 6.815,30.534 6.926,30.534 7.583,29.877 U4.4@7.583,28.325
NetJ4_1: J4.1 U3.5 | length 6.8
  Top Layer 1 w0.254: v1(18.034,29.591) 18.034,29.467 18.16,29.341 18.16,27.893 U3.5@18.236,27.817
  Bottom Layer 1 w0.254: v1(18.034,29.591) 18.848,30.405 18.975,30.405 19.701,31.131 19.701,32.528 J4.1
NetJ4_2: J4.2 U3.8 | length 6.5
  Top Layer 1 w0.254: v1(16.002,29.845) 16.017,29.83 16.017,29.235 16.271,28.981 16.271,27.832 U3.8@16.286,27.817
  Bottom Layer 1 w0.254: v1(16.002,29.845) 16.002,31.369 J4.2
NetJ4_3: J4.3 U3.9 | length 6.2
  Top Layer 1 w0.254: v1(14.859,29.845) 15.56,29.144 15.56,27.893 U3.9@15.636,27.817
  Bottom Layer 1 w0.254: v1(14.859,29.845) 14.859,29.923 15.43,30.495 15.43,33.337 J4.3
NetJ5_1: J5.1 U4.5 | length 6.7
  Top Layer 1 w0.254: U4.5@6.847,27.7 6.76,27.787 6.76,29.358 5.715,30.403 5.715,32.004 J5.1
NetJ5_2: J5.2 U4.8 | length 5.9
  Top Layer 1 w0.254: J5.2 4.572,30.353 4.81,30.115 4.81,27.66 U4.8
NetJ5_3: J5.3 U4.9 | length 6.7
  Top Layer 1 w0.254: J5.3 2.032,32.131 4.16,30.003 4.16,27.66 U4.9
NetL1_1: L1.1 U1.1 U1.2 U1.3 | length 0.1
  Bottom Layer 1 w0.254: L1.1 L1.1@25.734,3.682 ; U1.3@27.264,3.682 U1.3
NetQ1_4: Q1.4 R2.1 | length 2.7
  Bottom Layer 1 w0.254: R2.1 29.683,25.556 29.845,25.718 Q1.4@29.845,26.61
NetR1_1: R1.1 U1.4 | length 3.4
  Bottom Layer 1 w0.254: R1.1 25.177,5.619 25.177,5.351 25.146,5.32 25.146,4.953 25.527,4.572 26.797,4.572 U1.4@27.229,4.14
NetR1_2: R1.2 U1.14 | length 11.2
  Bottom Layer 1 w0.254: R1.2 24.032,5.692 24.384,5.34 24.384,0.657 24.533,0.508 28.448,0.508 28.949,1.009 28.949,1.991 U1.14
NetR4_1: R4.1 U3.26 | length 3.2
  Top Layer 1 w0.254: U3.26@19.547,21.914 19.547,20.204 v1(19.558,20.193)
  Bottom Layer 1 w0.254: R4.1@19.554,18.921 19.742,19.109 19.558,19.293 v1(19.558,20.193)
NetR5_1: R5.1 U3.22 | length 2.3
  Top Layer 1 w0.254: v1(16.891,20.193) 16.914,20.216 16.914,21.268 U3.22@16.936,21.29
  Bottom Layer 1 w0.254: R5.1@16.891,18.998 v1(16.891,20.193)
NetR6_1: R6.1 U3.24 | length 2.6
  Top Layer 1 w0.254: U3.24@18.109,22.052 U3.24@18.117,22.044 ; v1(18.161,20.193) 18.199,20.231 18.199,21.38 U3.24@18.236,21.417
  Bottom Layer 1 w0.254: R6.1@18.034,18.923 18.042,18.923 18.161,19.042 v1(18.161,20.193)
NetR8_1: R8.1 U4.26 | length 4.3
  Top Layer 1 w0.254: v1(8.001,19.431) 8.001,19.525 8.332,19.855 8.332,20.122 8.329,20.124 8.329,20.565 8.299,20.595 8.299,21.859 U4.26@8.233,21.925
  Bottom Layer 1 w0.254: v1(8.001,19.431) 8.001,19.337 8.263,19.075 8.263,18.384 8.486,18.161 R8.1
NetR9_1: R9.1 U4.22 | length 3.9
  Top Layer 1 w0.254: v1(5.611,19.148) 5.611,21.903 U4.22@5.633,21.925
  Bottom Layer 1 w0.254: R9.1 5.611,18.028 v1(5.611,19.148)
NetR10_1: R10.1 U4.24 | length 3.9
  Top Layer 1 w0.254: v1(6.985,19.558) 6.999,19.572 U4.24@6.999,21.859
  Bottom Layer 1 w0.254: v1(6.985,19.558) 6.985,18.877 7.112,18.75 R10.1
NRST: J2.5 U2.7 | length 13.8
  Top Layer 1 w0.254: J2.5 1.905,4.699 8.382,4.699 10.414,6.731 11.684,6.731 12.96,8.007 12.96,8.236 13.339,8.615 13.339,8.686 13.341,8.688 13.341,8.693 U2.7@13.485,8.837
OSC_IN: C10.1 U2.5 X1.1 | length 22.3
  Top Layer 1 w0.254: v1@8.509,6.35 9.532,6.35 11.665,8.483 12.206,8.483 12.339,8.616 12.339,8.691 12.487,8.839 U2.5 ; v1(11.049,1.016) 11.115,0.95 12.391,0.95 C10.1 ; C10.1@12.484,0.904 12.857,1.277 14.661,1.277 X1.1
  Bottom Layer 1 w0.254: v1(8.509,6.477) 5.504,3.472 5.504,0.889 6.223,0.17 10.33,0.17 v1@11.049,0.889
OSC_OUT: C11.1 U2.6 X1.3 | length 15.1
  Top Layer 1 w0.254: v1(11.754,7.546) 11.77,7.546 12.841,8.617 12.841,8.693 12.987,8.839 U2.6 ; X1.3 17.179,3.295 X1.3@17.279,3.295 ; v1(17.553,5.331) 17.553,3.569 X1.3@17.279,3.295 ; C11.1@19.393,3.668 19.373,3.648 17.632,3.648 X1.3@17.279,3.295
  Bottom Layer 1 w0.254: v1(11.754,7.546) 11.754,6.626 11.903,6.477 13.2,6.477 14.47,7.747 15.367,7.747 16.427,6.687 16.427,6.457 v1(17.553,5.331)
RX: J3.3 U2.10 | length 12.9
  Top Layer 1 w0.254: v1(14.344,6.329) 14.344,6.952 14.693,7.301 14.693,7.832 14.956,8.095 U2.10@14.956,8.873
  Bottom Layer 1 w0.254: J3.3 7.065,1.731 7.065,2.493 10.033,5.461 13.383,5.461 14.25,6.329 v1(14.344,6.329)
SCK1: D2.3 J6.1 U2.40 | length 81
  Top Layer 1 w0.254: U2.40 9.835,13.658 8.291,13.658 7.968,13.335 v1(7.874,13.335) 6.448,13.335 6.04,12.927 5.314,12.927 3.879,11.491 3.879,10.529 4.426,9.982 4.426,9.02 4.277,8.871 2.732,8.871 2.159,8.298 1.229,8.298 0.424,7.493 0.424,3.937 1.167,3.193 2.176,3.193 2.929,2.44 2.929,0.924 3.683,0.17 18.907,0.17 21.364,2.627 21.364,3.584 26.143,8.363 29.174,8.363 34.66,13.849 34.66,24.008 34.528,24.141 33.009,24.141 32.674,24.476 30.988,24.476 D2.3@28.416,21.904 ; D2.3 28.496,21.934 30.928,21.934 J6.1
SCK2: D5.3 J7.1 U2.27 | length 33.4
  Top Layer 1 w0.254: U2.27@14.989,15.983 15.133,16.127 15.133,16.132 15.135,16.134 15.135,16.205 15.621,16.691 15.708,16.691 15.908,16.891 v1(16.002,16.891) ; v1(22.098,17.391) 22.523,17.816 22.642,17.816 22.86,18.034 22.86,29.718 23.114,29.972 23.114,33.252 23.263,33.401 27.854,33.401 D5.3 ; D5.3@28.575,32.63 29.494,31.711 31.089,31.711 J7.1
  Bottom Layer 1 w0.254: v1(16.002,16.891) 16.023,16.891 16.404,16.51 19.888,16.51 19.934,16.556 21.382,16.556 21.586,16.76 21.586,16.879 v1(22.098,17.391)
"SENSE A INP": R12.2 R13.2 U2.9 U2.16 U3.7 U4.6 | length 56.3
  Top Layer 1 w0.254: U4.6 6.186,26.885 6.406,26.666 6.406,26.588 6.539,26.455 9.733,26.455 10.221,26.942 16.711,26.942 16.86,27.091 16.86,27.614 U3.7@16.936,27.69 ; R13.2@11.303,5.461 11.69,5.461 12.452,6.223 13.081,6.223 14.339,7.481 14.339,7.838 ; v1(12.954,7.112) 13.386,7.544 13.903,7.544 14.198,7.838 14.339,7.838 ; U2.9@14.485,8.837 14.485,8.329 14.339,8.183 14.339,7.838 ; U2.16@16.608,11.196 16.61,11.194 16.658,11.194 16.767,11.303 17.164,11.303 17.204,11.263 17.439,11.263 v1(17.526,11.176) ; U3.7@16.891,27.69 v1@16.891,29.591
  Bottom Layer 1 w0.254: R12.2 12.573,7.493 v1(12.954,7.112) ; v1(17.018,29.591) 16.432,29.005 16.432,25.859 23.26,19.031 23.26,17.507 23.495,17.272 23.495,17.018 24.406,16.107 24.406,15.897 24.003,15.494 20.374,15.494 20.139,15.259 16.736,15.259 16.256,14.779 16.256,13.081 17.526,11.811 v1(17.526,11.176)
"SENSE B INP": R11.2 R14.2 U2.15 U2.25 U3.6 U4.7 | length 52.1
  Top Layer 1 w0.254: U4.7 5.536,26.885 5.756,26.666 5.756,26.588 6.243,26.101 9.972,26.101 10.459,26.588 17.063,26.588 17.145,26.67 17.662,26.67 ; U2.25@15.958,15.846 18.005,15.846 18.034,15.875 18.034,16.175 18.257,16.398 18.604,16.398 18.958,16.752 19.546,16.752 19.812,17.018 ; U2.15@16.81,10.658 17.367,10.658 17.738,10.287 v1(17.78,10.287) ; U3.6@17.586,27.69 17.662,27.614 17.662,26.67 ; v1(21.971,11.049) 23.359,12.437 23.359,14.724 22.077,16.006 20.824,16.006 19.812,17.018 ; 17.662,26.67 19.304,26.67 22.426,23.548 22.426,19.632 19.812,17.018
  Bottom Layer 1 w0.254: R11.2 14.828,11.94 15.132,11.94 15.686,11.386 15.686,10.603 16.637,9.652 17.272,9.652 17.452,9.832 17.452,9.865 17.78,10.193 v1(17.78,10.287) 18.777,11.284 19.375,11.284 19.418,11.328 19.768,11.328 19.781,11.315 19.808,11.315 19.832,11.291 21.705,11.291 v1@21.819,11.176
SWCLK: J2.2 U2.38 | length 9.1
  Top Layer 1 w0.254: J2.2 1.873,12.287 3.673,12.287 5.202,13.816 5.927,13.816 6.589,14.478 8.643,14.478 8.86,14.694 9.555,14.694 9.587,14.662 U2.38@9.664,14.662
SWDIO: J2.1 U2.37 | length 8.7
  Top Layer 1 w0.254: J2.1 2.005,14.251 5.862,14.251 6.627,15.016 8.703,15.016 8.881,15.194 U2.37@9.806,15.194
TX: J3.2 U2.41 | length 17.4
  Top Layer 1 w0.254: v1(5.207,9.779) 4.233,10.753 4.233,11.345 5.461,12.573 8.128,12.573 8.567,13.012 9.518,13.012 9.666,13.16 U2.41
  Bottom Layer 1 w0.254: J3.2 4.445,1.651 4.445,3.877 5.588,5.02 5.588,9.377 5.207,9.758 v1(5.207,9.779)
pads on no net: J1.3 J1.4 J6.7 J6.8 J7.7 J7.8 U2.1 U2.3 U2.4 U2.17 U2.33 U2.34 U2.45 U2.49 U3.10 U3.12 U3.13 U3.15 U3.16 U3.19 U3.21 U4.10 U4.12 U4.13 U4.15 U4.16 U4.19 U4.21 U4.25

## Polygon pours and split planes (outlines as drawn)
+3V3 on Bottom Layer 1 "+3V3_L04_P004" (solid, pour order 4): 3.556,17.272 3.683,17.399 9.271,17.399 9.271,16.129 3.556,16.129 3.556,17.399
+12V on Bottom Layer 1 "+12V_L04_P010" (solid, pour order 10): 29.718,32.766 34.163,32.766 34.163,30.734 33.782,30.353 29.718,30.353 28.575,29.21 28.575,26.543 25.654,26.543 25.527,26.67 25.654,26.797 25.654,32.766
+12V on Bottom Layer 1 "+12V_L04_P011" (solid, pour order 11): 29.353,2.417 29.337,2.401 29.337,1.27 30.353,1.27 31.242,2.159 31.242,3.81 29.745,3.81 29.659,3.724 29.659,2.417 29.369,2.417 29.361,2.425
GND on Bottom Layer 1 "GND_L04_P002" (solid, pour order 2): 28.448,6.604 32.258,6.604 32.639,6.223 32.639,5.461 29.972,5.461 29.591,5.08 29.591,2.798 29.359,2.565 29.337,2.587 27.837,2.587 27.837,5.398 27.808,5.427 27.99,5.609 28.419,5.609 28.419,6.548 28.456,6.584
NetL1_1 on Bottom Layer 1 "NETL1_1_L04_P000" (solid, pour order 0): 25.019,4.064 26.797,3.937 27.813,3.937 27.813,2.413 25.019,2.413 25.019,3.175
GND on GND "GND_L02_P006" (solid, pour order 6): 0.127,34.671 34.925,34.671 34.925,0 34.798,-0.127 0.127,-0.127
+3V3 on PWR "+3V3_L03_P012" (solid, pour order 12): -0.127,34.671 34.798,34.671 34.798,0 34.544,-0.254 0,-0.254 0,34.036 -0.254,34.29

## Silkscreen, mask and mechanical layers (free items; w line width, h text height)
Mechanical 1:
  lines w0.254: 0,-0.254 35,-0.254 35,34.746 0,34.746 0,-0.254